# Altium PCB TuringSMD.PcbDoc (part 2 of 2)
Units mil, origin at the board's own origin, x right, y up, seen from the top; angles counter-clockwise.
Board outline 1102.36 x 3937.01 mil, 2 copper layers (Top Layer, Bottom Layer); 69 components, 85 nets, 266 pads, 122 vias.
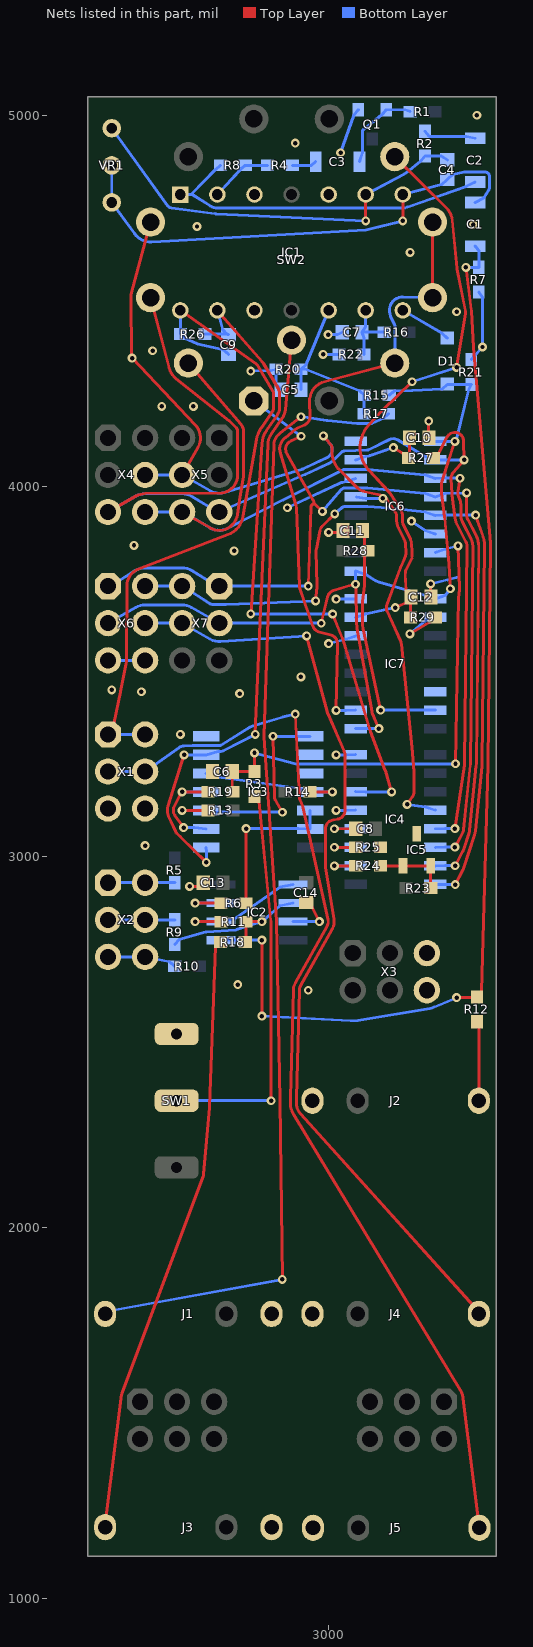
[diagram p2: the nets of this part, all layers, seen from the top]

## Via types
v1: diameter 24, hole 12, Top Layer to Bottom Layer, tented both sides, 122 vias

## Nets (pads, with @x,y where several pads share a name; then routed paths per layer and width w, separated by ;. In a path a pad name is that pad's centre, name@x,y a point inside that pad or via, vN(x,y) a via of type N, cw(c..) or ccw(c..) an arc to the next point about the centre after c; other vN are vias at no path point) (continued)
B4: IC4.12 IC6.5 SW2.4 X4.4 X5.4 | length 2651
  Top Layer w8: SW2.4@2519.71,4711.9 2468.21,4522.08 ccw(c2519.71,4508.1) 2466.35,4507.6 2467.82,4350.42 ccw(c2475.82,4350.49) v1(2470,4345) 2640.94,4163.94 cw(c2605,4130) 2647.97,4105.56 X5.4@2605,4030 ; v1(2985.69,4135.31) 3003.85,4114.03 cw(c2985.59,4098.45) 3009.59,4098.45 3009.59,4084.91 ccw(c3050.09,4084.91) 3013.8,4066.93 3018.71,4057.02 ccw(c3055,4075) 3026.36,4046.36 3077.06,3995.66 ccw(c3105.7,4024.3) 3097.22,3984.7 3139.9,3975.56 cw(c3138.22,3967.74) v1@3146.2,3968.3 ; v1@3146.22,3971.12 v1(3146.22,3966.84) ; v1(3211.66,3141.21) 3226.15,3161.86 ccw(c3206.5,3175.65) 3230.5,3175.92 3229.93,3226.1 ccw(c3189.93,3225.65) 3229.8,3228.84 3225.76,3280.04 ccw(c3169.93,3275.65) 3225.65,3281.22 3196.59,3573.14 ccw(c3164.75,3569.97) 3193.86,3583.26 3157.77,3662.31 cw(c3179.61,3672.28) 3157.1,3680.62 3193.16,3777.93 cw(c3231.14,3763.86) 3194.2,3780.48 3203.91,3802.05 ccw(c3174.73,3815.18) 3205.14,3805.24 3207.45,3812.29 ccw(c3177.03,3822.22) 3208.96,3824.24 3207.93,3840.59 ccw(c3168.01,3838.06) 3203.71,3856.1 3187.86,3887.49 cw(c3223.56,3905.52) 3183.56,3905.52 3183.56,3916.74 ccw(c3159.56,3916.74) 3179.59,3929.97 3157.01,3964.36 ccw(c3150.32,3959.97) 3155.96,3965.65 3155.01,3966.6 ccw(c3149.35,3960.95) v1@3146.2,3968.31 ; v1(3146.22,3966.84) 3146.17,3971.12 v1@3146.2,3968.31 ; v1(3146.22,3966.84) v1@3146.2,3968.3
  Bottom Layer w8: X4.4@2505,4030 X5.4@2605,4030 2680.56,3987.03 ccw(c2705,4030) 2719.17,3982.64 2927.11,4044.84 ccw(c2917.94,4075.5) 2931.55,4046.54 2995.8,4076.73 ccw(c2985.59,4098.45) 3003.85,4114.03 v1(2985.69,4135.31) ; IC6.5@3075.36,3970.65 3099.59,3966.84 v1(3146.22,3966.84) ; v1(3211.66,3141.21) 3261.13,3134.44 IC4.12@3287.65,3125.65
B5: IC4.13 IC6.10 R27.2 SW2.3 X4.5 X5.5 | length 3257.4
  Top Layer w8: X4.5@2405,3930 2480.56,3972.97 cw(c2505,3930) 2504.72,3979.43 2705.28,3980.57 ccw(c2705,4030) 2754.43,4030 2754.43,4147.72 ccw(c2740.43,4147.72) 2750.36,4157.59 2732.59,4175.36 ccw(c2722.72,4165.43) 2731.42,4176.4 2588.45,4289.8 cw(c2621.61,4331.61) 2570.02,4317.96 SW2.3@2519.71,4508.1 ; R27.2@3282.65,4075.65 3296.36,4087.39 3319,4131.59 cw(c3340.36,4120.65) 3364.36,4121.08 3365.35,4071.34 v1(3365.36,4070.65) 3365.33,4070.58 cw(c3358.19,4074.2) 3364.22,4068.94 3336.26,4036.93 ccw(c3354.33,4021.14) 3330.36,4019.97 3332.34,3979.59 ccw(c3372.29,3981.55) 3332.65,3976.24 3341,3913.95 ccw(c3396.5,3921.39) 3346.66,3895.84 3370.26,3849.8 cw(c3348.94,3838.79) 3372.94,3838.51 3366.23,3250.61 cw(c3342.23,3250.88) 3365.97,3247.33 v1(3340.37,3076.06)
  Bottom Layer w8: X4.5@2405,3930 2480.56,3972.97 cw(c2505,3930) 2505,3979.43 2605,3979.43 cw(c2605,3930) 2630.33,3972.45 2699.62,3931.1 ccw(c2703.67,3938) 2703.62,3930 X5.5@2705,3930 2706.3,3930.44 ccw(c2703.67,3938) 2706.88,3930.67 2937.2,4031.53 ccw(c2917.94,4075.5) 2938.36,4032.05 3002.6,4062.25 ccw(c2985.59,4098.45) 3013.97,4070.26 3034.76,4091.19 cw(c3042.57,4083.44) 3042.14,4094.43 3104.02,4096.86 ccw(c3103.59,4107.85) 3108.43,4097.97 3164.14,4125.3 cw(c3174.71,4103.75) 3187.15,4124.28 3261.13,4079.44 IC6.10@3287.65,4070.65 v1(3365.36,4070.65) ; IC4.13@3287.65,3075.65 3314.16,3076.06 v1(3340.37,3076.06)
B6: IC4.14 IC6.11 SW2.2 X4.6 X5.6 | length 2614.1
  Top Layer w8: X5.6@2605,3930 2680.56,3887.03 ccw(c2705,3930) 2753.93,3922.98 2759.32,3960.55 ; SW2.2@2621.61,4331.61 2763.16,4167.3 cw(c2740.43,4147.72) 2770.43,4147.72 2770.43,4030 cw(c2705,4030) 2769.45,4018.69 2759.48,3961.5 ccw(c2791,3956) 2759.33,3960.55 ; v1(3340.78,3025.86) 3361.54,3064.76 ccw(c3340.37,3076.06) 3364.24,3073.61 3382.02,3246.79 ccw(c3342.23,3250.88) 3382.23,3250.48 3388.94,3838.33 ccw(c3348.94,3838.79) 3384.54,3857.03 3360.9,3903.14 cw(c3396.5,3921.39) 3356.5,3921.39 3356.5,3950.15 ccw(c3324.5,3950.15) 3354.25,3961.93 3349.98,3972.71 cw(c3372.29,3981.55) 3348.6,3985.35 v1(3354.33,4021.14)
  Bottom Layer w8: X4.6@2505,3930 X5.6@2605,3930 2605.11,3930 cw(c2604.91,3922) 2608.95,3928.91 2680.04,3887.33 ccw(c2705,3930) 2727.45,3885.96 2878.06,3962.72 cw(c2888.96,3941.33) 2878.15,3962.76 3037.61,4043.26 cw(c3042.57,4033.44) 3042.57,4044.44 3103.59,4044.44 cw(c3103.59,4033.44) 3104.64,4044.39 3261.13,4029.44 IC6.11@3287.65,4020.65 3314.16,4021.14 v1(3354.33,4021.14) ; IC4.14@3287.65,3025.65 3314.16,3025.86 v1(3340.78,3025.86)
B7: IC4.15 IC6.12 SW2.1 X6.1 X7.1 | length 2703.3
  Top Layer w8: v1(2925.92,4134.26) 2897.9,4121.27 ccw(c2908,4099.5) 2887.13,4087.64 2958.95,3961.22 cw(c2952,3957.26) 2960,3957.27 2960,3953.95 ; v1(2945,3730) 2952.09,3942.98 cw(c2960.08,3942.72) 2954.41,3948.36 2960,3953.95 ; v1(2983.28,3931.72) 2962.45,3951.5 cw(c2968,3957.27) 2962.36,3951.59 2960,3953.95 ; v1(3341.2,2975.87) 3361.93,3014.52 ccw(c3340.78,3025.86) 3363.59,3018.4 3378.38,3063.63 ccw(c3340.37,3076.06) 3380.16,3071.97 3397.93,3245.14 ccw(c3342.23,3250.88) 3398.23,3250.24 3404.93,3838.14 ccw(c3348.94,3838.79) 3398.75,3864.38 3375.16,3910.4 cw(c3396.5,3921.39) 3372.5,3921.39 3372.5,3950.15 ccw(c3324.5,3950.15) 3372.5,3950.46 v1(3372.29,3981.55)
  Bottom Layer w8: X6.1@2405,3730 2436.43,3746.06 2479.24,3772.19 cw(c2505,3730) 2505,3779.43 2605,3779.43 cw(c2605,3730) 2630.76,3772.19 2673.57,3746.06 X7.1@2705,3730 v1(2945,3730) ; SW2.1@2798.1,4229.71 v1(2925.92,4134.26) ; v1(2983.28,3931.72) 3034.25,3990.64 cw(c3042.57,3983.44) 3042.57,3994.44 3103.59,3994.44 cw(c3103.59,3983.44) 3104.5,3994.4 3148.22,3990.76 cw(c3146.22,3966.84) 3148.62,3990.72 3261.13,3979.44 IC6.12@3287.65,3970.65 3314.16,3979.44 v1(3372.29,3981.55) ; IC4.15@3287.65,2975.65 3314.16,2975.87 v1(3341.2,2975.87)
B8: IC4.16 IC6.13 X6.2 X7.2 | length 2181.4
  Top Layer w8: v1(2965,3690) 2968.87,3727.54 ccw(c2945,3730) 2968.99,3730.67 2966.37,3824.98 cw(c2990.36,3825.65) 2966.81,3830.25 2976.44,3879.6 cw(c3000,3875) 2983.17,3892.11 v1(3016.6,3925) ; v1(3341.61,2925.04) 3362.45,2964.71 ccw(c3341.2,2975.87) 3364,2968.38 3378.78,3013.38 ccw(c3340.78,3025.86) 3378.8,3013.43 3393.58,3058.63 ccw(c3340.37,3076.06) 3396.07,3070.34 3413.84,3243.45 ccw(c3342.23,3250.88) 3414.22,3250.06 3420.93,3837.9 ccw(c3348.94,3838.79) 3416.96,3862.38 v1(3396.5,3921.39)
  Bottom Layer w8: X6.2@2505,3730 X7.2@2605,3730 2605.11,3730 cw(c2604.91,3722) 2609.28,3728.7 2679.64,3682.84 ccw(c2687.28,3694.57) 2687.28,3680.57 2722.72,3680.57 ccw(c2722.72,3694.57) 2723.26,3680.58 v1(2965,3690) ; v1(3016.6,3925) 3035.24,3941.65 cw(c3042.57,3933.44) 3042.57,3944.44 3103.59,3944.44 cw(c3103.59,3933.44) 3104.31,3944.42 3161.14,3940.68 cw(c3159.56,3916.74) 3162.25,3940.59 3261.13,3929.44 IC6.13@3287.65,3920.65 3314.16,3921.39 v1(3396.5,3921.39) ; IC4.16@3287.65,2925.65 3314.16,2925.04 v1(3341.61,2925.04)
BUFFCLK1: 
BUFFCLK2: 
CHANGE_B: R10.2 X2.5 X2.6 | length 185.7
  Bottom Layer w8: X2.5@2405,2730 X2.6@2505,2730 cw(c2505,2722) 2506.58,2729.84 2571.28,2716.75 R10.2@2585,2705
CHANGE_T: R5.2 X2.1 X2.2 | length 180
  Bottom Layer w8: X2.1@2405,2930 R5.2@2585,2930
CHANGE_W: R9.1 X2.3 X2.4 | length 180
  Bottom Layer w8: X2.3@2405,2830 R9.1@2585,2830
CLK: D1.2 IC6.1 IC6.9 IC7.1 IC7.9 R15.2 R21.2 X6.3 X7.3 | length 2382.6
  Top Layer w8: v1(2980,3630) 2996.64,3700.51 cw(c3020,3695) 3012.95,3717.94 3063.49,3733.61 cw(c3065.86,3725.96) 3063.63,3733.65 3064.15,3733.8 cw(c3066.4,3726.12) 3065.34,3734.05 v1(3072.5,3735.01) 3073.65,3729.5 cw(c3065.82,3727.86) 3073.82,3728 3075.62,3627.86 ccw(c3155.61,3629.3) 3076.85,3615.26 3116.73,3391.44 ccw(c3140.36,3395.65) 3118.24,3386.34 v1(3135.36,3345.65) ; v1(3328.51,3722.94) 3324.86,3787.78 ccw(c3275.44,3785) 3324.73,3789.58 3313.18,3913.79 ccw(c3223.56,3905.52) 3312.74,3917.68 3304.29,3979.58 cw(c3336,3983.9) 3304,3983.9 3304,4002.81 cw(c3336,4002.81) 3305.54,4012.63 v1(3340.36,4120.65)
  Bottom Layer w8: X6.3@2405,3630 2480.56,3672.97 cw(c2505,3630) 2505,3679.43 2605,3679.43 cw(c2605,3630) 2629.44,3672.97 X7.3@2705,3630 v1(2980,3630) ; v1(3072.5,3735.01) 3072.5,3761.85 IC6.1@3073.08,3770.65 3099.59,3761.85 3122.29,3747.24 ccw(c3149.08,3788.86) 3135.16,3741.36 3261.13,3704.44 IC7.9@3287.65,3695.65 3314.16,3704.44 v1(3328.51,3722.94) ; IC7.1@3073.08,3345.65 v1(3135.36,3345.65) ; R15.2@3163.46,4245 3177.18,4256.75 3225.54,4257.34 ccw(c3225.25,4281.34) 3226.44,4257.37 3305.3,4261.28 3320,4274.02 R21.2@3385,4274.02 3377.95,4260.3 3344.81,4126.72 cw(c3337.05,4128.65) 3342.71,4122.99 v1(3340.36,4120.65) IC6.9@3287.65,4120.65
G1: 
G2: 
G3: 
G4: 
G5: 
G6: 
G7: 
G8: 
GND: C5.1 C6.1 C7.1 C10.1 C11.1 C12.1 C13.1 C14.1 IC1.3 IC1.5 IC1.12 IC2.3 IC3.7 IC3.9 IC3.10 IC4.5 IC4.8 IC5.3 IC6.6 IC6.8 IC6.14 IC7.6 IC7.8 IC7.14 J1.1 J2.1 J3.1 J4.1 J5.1 Q1.1 R7.2 R20.1 R21.1 R22.1 R25.2 SW1.1 X1.5 X1.6 X3.5 X3.6 X6.5 X6.6 | length 1515.4
  Top Layer w8: v1(2625.22,2920) 2648.13,2920 C13.1@2661.85,2930 ; C14.1@2940,2876.85 2955.69,2863.13 v1(2975,2825) ; v1(3000,3875) 3024.71,3875 C11.1@3038.43,3880 ; v1(3270,4175) 3270,4146.33 C10.1@3270.8,4130.65 ; v1(3275,3735.85) 3275,3716.33 C12.1@3275.8,3700.65
  Bottom Layer w8: X6.5@2405,3530 X6.6@2505,3530 ; v1(2790,4310) 2844.35,4311.03 R20.1@2858.07,4315 2858.13,4303.25 2858.13,4275.69 C5.1@2871.85,4260 ; v1(2888.96,3941.33) 3031.12,4007.89 cw(c3042.57,3983.44) 3037.07,4009.88 3046.57,4011.85 IC6.6@3073.08,4020.65 ; IC2.3@2904,2825 v1(2975,2825) ; v1(2985,4355) R22.1@3028.07,4355 ; v1(2998.78,4408.42) 3023.13,4408.42 C7.1@3036.85,4415 ; v1(3000,3575) 3046.57,3586.85 IC7.6@3073.08,3595.65 ; v1(3020,3125) 3046.57,3125 IC4.5@3073.08,3125.65 ; v1(3020,3275) 3046.57,3275 IC4.8@3073.08,3275.65 ; v1(3020,3695) 3046.57,3695 IC7.8@3073.08,3695.65 ; v1(3032.13,4898.96) 3068.45,5001.28 Q1.1@3080.2,5015 ; v1(3223.56,3905.52) 3261.13,3879.44 IC6.14@3287.65,3870.65 ; v1(3275,3735.85) 3320.8,3747.17 ccw(c3318.16,3757.85) 3321.01,3747.23 3350,3755 ; R21.1@3385,4340.94 3396.75,4354.66 v1(3415,4375) 3415,4509.35 R7.2@3405,4523.07
  other v1: 2945,2640 2755,2655 2505,3030 2600,3330 2760,3440 2495,3445 2415,3450 2925,3485 2745,3825 2475,3840 2550,4215 2635,4215 2525,4365 3345,4470 3220,4630 2645,4700 3390,4705 2910,4925 3400,5000
NetC1_1: C1.1 C4.2 IC1.7 VR1.2 VR1.3 | length 1353.8
  Top Layer w8: v1(3200,4715) IC1.7@3200,4786.3
  Bottom Layer w8: VR1.2@2415,4865 VR1.3@2415,4765 2476.58,4680.47 ccw(c2519.71,4711.9) 2522.7,4658.61 3101.34,4691.04 ccw(c3100,4715) 3105.76,4691.7 v1(3200,4715) ; IC1.7@3200,4786.3 3304.31,4813.13 C4.2@3320,4826.85 3335.69,4840.57 3365.27,4846.53 cw(c3367.44,4835.75) 3367.44,4846.75 3422.56,4846.75 cw(c3422.56,4835.75) 3433.56,4835.75 3433.56,4804.25 cw(c3422.56,4804.25) 3431.93,4798.49 3418.56,4776.75 C1.1@3395,4765
NetC2_1: C2.1 IC1.1 R8.2 | length 928.5
  Bottom Layer w8: IC1.1@2600,4786.3 2618.24,4786.27 2629.64,4786.27 cw(c2629.6,4778.27) 2631.56,4786.03 ; 2629.56,4786.49 2631.68,4788.61 ccw(c2626.03,4794.27) 2631.76,4788.69 2694.35,4853.25 R8.2@2708.07,4865 ; 2631.64,4786.01 cw(c2629.6,4778.27) 2633.84,4785.06 2680.72,4755.61 ccw(c2700,4786.3) 2700,4750.06 3200,4750.06 ccw(c3200,4786.3) 3212.04,4752.11 3371.44,4808.25 C2.1@3395,4820
NetC2_2: C2.2 R2.2 | length 141.9
  Bottom Layer w8: R2.2@3260,4956.93 3271.75,4943.21 3371.44,4943.21 C2.2@3395,4938.11
NetC3_1: C3.1 Q1.2 R1.1 | length 235.9
  Bottom Layer w8: C3.1@3083.11,4875 3090.85,4898.56 3090.85,4953.98 cw(c3101.85,4953.98) 3094.97,4962.56 3143.25,5001.28 Q1.2@3155,5015 3206.28,5015 R1.1@3220,5010
NetC3_2: C3.2 R4.2 | length 66.8
  Bottom Layer w8: R4.2@2901.93,4865 2953.25,4865 C3.2@2965,4875
NetC4_1: C4.1 IC1.6 R2.1 VR1.1 | length 1121.5
  Top Layer w8: v1(3100,4715) IC1.6@3100,4786.3
  Bottom Layer w8: VR1.1@2415,4965 2566.42,4755.85 ccw(c2577.76,4764.06) 2575.9,4750.18 2693.08,4734.52 ccw(c2700,4786.3) 2697.52,4734.11 v1(3100,4715) ; IC1.6@3100,4786.3 3203.43,4841.26 ccw(c3178.39,4888.39) 3211.97,4846.91 3248.25,4876.28 R2.1@3260,4890 3304.31,4890 C4.1@3320,4880
NetC5_2: C5.2 IC1.10 R15.1 R17.1 R20.2 | length 466
  Bottom Layer w8: C5.2@2925,4260 R20.2@2925,4315 2938.72,4326.75 IC1.10@3000,4473.7 ; R20.2@2926.97,4315 2938.72,4315 3082.82,4256.75 R15.1@3096.54,4245 ; R17.1@3095,4195 R15.1@3095,4243.46
NetC7_2: C7.2 IC1.9 R16.1 R22.2 | length 182.4
  Bottom Layer w8: R22.2@3095,4355 3095,4399.31 C7.2@3090,4415 ; IC1.9@3100,4473.7 3100,4430.69 C7.2@3090,4415 ; R16.1@3150,4415 C7.2@3090,4415
NetC8_2: C8.2 IC4.4 | length 115.4
  Top Layer w8: v1(3015.36,3075.65) C8.2@3073.08,3075.65
  Bottom Layer w8: v1(3015.36,3075.65) IC4.4@3073.08,3075.65
NetC9_1: C9.1 IC1.13 IC4.6 R26.1 | length 1848.1
  Top Layer w8: IC1.13@2700,4473.7 2820.11,4336.33 cw(c2790,4310) 2824.45,4330.33 2863.29,4264.68 cw(c2837.47,4249.4) 2867.47,4249.4 2867.47,4210.03 cw(c2837.47,4210.03) 2862.24,4193.1 2832.2,4149.16 ccw(c2904.84,4099.5) 2828.5,4143.26 ccw(c2884,4111.39) 2820.14,4115.57 v1(2790,3655) ; v1(3010.53,3654.87) 3037.02,3590.15 cw(c3000,3575) 3038.32,3586.46 3112.37,3338.77 ccw(c3135.36,3345.65) 3112.94,3337.09 3152.42,3233.57 cw(c3130,3225) 3152.99,3231.88 v1(3170,3175)
  Bottom Layer w8: R26.1@2666.93,4410 C9.1@2726.18,4410 ; IC1.13@2700,4473.7 2714.31,4421.87 C9.1@2726.18,4410 ; C9.1@2730,4408.15 cw(c2731.48,4416.01) 2726.58,4409.69 C9.1@2726.18,4410 ; v1(2790,3655) v1(3010.53,3654.87) ; IC4.6@3073.08,3175.65 3099.59,3175 v1(3170,3175)
NetC10_2: C10.2 IC6.7 R27.1 | length 212
  Top Layer w8: v1(3174.71,4103.75) 3202,4087.39 R27.1@3215.72,4075.65 3217.65,4087.39 C10.2@3217.65,4130.65
  Bottom Layer w8: IC6.7@3073.08,4070.65 3099.59,4079.44 3109.09,4081.42 ccw(c3103.59,4107.85) 3112.37,4082.32 v1(3174.71,4103.75)
NetC11_2: C11.2 IC7.15 R28.1 | length 644.5
  Top Layer w8: C11.2@3091.57,3880 3096.98,3864.31 3096.98,3837.39 R28.1@3106.15,3825.65 3096.5,3813.9 3096.5,3735.01 cw(c3072.5,3735.01) 3096.38,3732.6 3091.93,3688.66 ccw(c3155.61,3682.22) 3091.61,3682.22 3091.61,3629.3 ccw(c3155.61,3629.3) 3093.04,3615.85 v1(3140.36,3395.65)
  Bottom Layer w8: v1(3140.36,3395.65) IC7.15@3287.65,3395.65
NetD1_1: D1.1 IC1.8 | length 141.8
  Bottom Layer w8: IC1.8@3200,4473.7 3305.3,4412.73 D1.1@3320,4399.02
NetD2_2: 
NetD3_2: 
NetD4_2: 
NetD5_2: 
NetD6_2: 
NetD7_2: 
NetD8_2: 
NetD9_2: 
NetD10_1: 
NetD11_1: 
NetIC1_2: IC1.2 R4.1 R8.1 | length 168.8
  Bottom Layer w8: IC1.2@2700,4786.3 2761.28,4853.25 R8.1@2775,4865 R4.1@2835,4865
NetIC2_1: IC2.1 IC2.6 R11.2 | length 362.3
  Top Layer w8: v1(2640,2825) R11.2@2710,2825
  Bottom Layer w8: v1(2640,2825) IC2.6@2710,2825 2745,2832 2869,2918 IC2.1@2904,2925
NetIC2_2: IC2.2 R9.2 R11.1 R18.2 | length 446.8
  Top Layer w8: R18.2@2775,2770 2776.93,2781.75 R11.1@2776.93,2825 v1(2820,2825)
  Bottom Layer w8: R9.2@2585,2763.07 2596.75,2776.79 2668.06,2796.6 cw(c2671,2786) 2670.17,2796.97 2749.83,2803.03 ccw(c2749,2814) 2752.33,2803.52 v1(2820,2825) 2869,2868 IC2.2@2904,2875
NetIC2_7: IC2.7 R6.1 | length 140
  Top Layer w8: v1(2640,2875) R6.1@2710,2875
  Bottom Layer w8: v1(2640,2875) IC2.7@2710,2875
NetIC3_1: IC3.1 IC3.6 SW2.A | length 1657.7
  Top Layer w8: v1(2610,3275) 2566.82,3136.94 ccw(c2605,3125) 2568.64,3108.33 2586.79,3068.73 ccw(c2608.61,3078.73) 2592.13,3061.28 2601.48,3052.45 cw(c2585,3035) 2601.84,3052.1 v1(2670,2985) ; v1(2802,3330) 2836.05,4113.48 cw(c2884,4111.39) 2842.38,4135.3 cw(c2904.84,4099.5) 2845.44,4140.18 2875.43,4184.04 ccw(c2837.47,4210.03) 2883.29,4205.95 SW2.A@2900,4393.46
  Bottom Layer w8: v1(2610,3275) IC3.6@2669.76,3275 2701.69,3284.2 2705.88,3284.22 ccw(c2705.69,3311.22) 2717.95,3287.16 v1(2802,3330) ; IC3.1@2669.76,3025 2670,3015.22 v1(2670,2985)
NetIC3_2: IC3.2 IC3.4 R19.2 | length 306.8
  Top Layer w8: v1(2608.61,3078.73) 2585.48,3111.03 cw(c2605,3125) 2583.58,3135.83 2601.17,3170.61 cw(c2608.31,3167) 2602.64,3172.64 v1(2605,3175) R19.2@2675,3175
  Bottom Layer w8: v1(2605,3175) IC3.4@2669.76,3175 ; v1(2608.61,3078.73) 2637.84,3078.73 IC3.2@2669.76,3075
NetIC3_3: IC3.3 IC3.8 R13.1 | length 651.1
  Top Layer w8: v1(2605,3125) R13.1@2675,3125 ; v1(2850,3325) 2854.36,3158.96 ccw(c2865.35,3159.25) 2855.83,3153.76 ; 2855.82,3153.76 v1(2875.18,3120.18)
  Bottom Layer w8: v1(2605,3125) IC3.3@2669.76,3125 2701.69,3120.18 v1(2875.18,3120.18) ; v1(2850,3325) IC3.8@2950.24,3325
NetIC3_5: IC3.5 IC3.11 R14.1 | length 405.3
  Top Layer w8: R14.1@2950,3175 v1(3010,3175)
  Bottom Layer w8: IC3.5@2669.76,3225 2701.69,3215.22 2918.31,3184.78 IC3.11@2950.24,3175 v1(3010,3175)
NetIC3_12: IC3.12 IC3.13 R6.2 | length 424
  Top Layer w8: R6.2@2776.93,2875 2777.39,2886.75 v1(2777.39,3076.16)
  Bottom Layer w8: v1(2777.39,3076.16) 2918.31,3076.16 IC3.13@2950.24,3075 IC3.12@2950.24,3125
NetIC4_2: IC4.2 R24.1 | length 115.4
  Top Layer w8: v1(3015.36,2975.65) R24.1@3073.08,2975.65
  Bottom Layer w8: v1(3015.36,2975.65) IC4.2@3073.08,2975.65
NetIC4_3: IC4.3 R25.1 | length 115.4
  Top Layer w8: v1(3015.36,3025.65) R25.1@3073.08,3025.65
  Bottom Layer w8: v1(3015.36,3025.65) IC4.3@3073.08,3025.65
NetIC5_1: IC5.1 IC5.2 R23.1 R24.2 | length 195.2
  Top Layer w8: R24.2@3140.01,2975.65 IC5.2@3275.17,2975.65 3275.17,2927.39 R23.1@3275.36,2915.65
NetIC7_10: IC7.10 R29.2 | length 164.4
  Top Layer w8: v1(3219.31,3601.42) 3273.93,3633.9 R29.2@3287.65,3645.65
  Bottom Layer w8: v1(3219.31,3601.42) 3261.13,3636.85 IC7.10@3287.65,3645.65
NetJ1_3: J1.3 R17.2 | length 3098.3
  Top Layer w8: v1(2875,1860) 2869,2342.35 ccw(c2845,2342.05) 2869,2342.49 2859.99,2825.74 ccw(c2820,2825) 2859.9,2827.83 2826.06,3323.36 cw(c2850,3325) 2826.01,3325.79 2852.02,4112.45 cw(c2884,4111.39) 2856.23,4127.29 cw(c2904.84,4099.5) 2870.18,4143.48 v1(2925.4,4186.99)
  Bottom Layer w8: J1.3@2397.24,1766.89 2397.24,1772.8 v1(2875,1860) ; v1(2925.4,4186.99) 2994.15,4176.91 ccw(c3001.9,4229.71) 2996.36,4176.63 3076.14,4168.31 ccw(c3077.28,4179.25) 3077.28,4168.25 3112.72,4168.25 ccw(c3112.72,4179.25) 3117.25,4169.23 3148.21,4183.25 R17.2@3161.93,4195
NetJ2_3: J2.3 R12.1 | length 213.9
  Top Layer w8: R12.1@3400,2555 3405.12,2541.28 J2.3@3405.12,2342.05
NetJ3_3: J3.3 R18.1 | length 1628.3
  Top Layer w8: J3.3@2397.24,1191.73 2397.24,1197.64 2441.82,1549.48 cw(c2455.71,1547.72) 2442.6,1552.62 2661.22,2136.88 ccw(c2634.06,2147.05) 2662.94,2144.47 2678.88,2323.05 ccw(c2634.06,2327.05) 2679.03,2325.45 2694.35,2758.25 R18.1@2708.07,2770
NetR3_2: R3.2 SW1.2 | length 1082
  Top Layer w8: R3.2@2800,3163.07 2811.75,3149.35 2843.88,2827.38 cw(c2820,2825) 2844,2825.05 v1(2845,2342.05)
  Bottom Layer w8: SW1.2@2590,2342.05 v1(2845,2342.05)
NOISE: C1.2 IC2.5 R7.1 R12.2 | length 2975.3
  Top Layer w8: v1(2820,2570) v1(2820,2775) ; v1(3345,2620) 3388.25,2620 R12.2@3400,2621.93 3411.75,2635.65 3430.19,3248.23 ccw(c3342.23,3250.88) 3430.22,3249.87 3436.93,3837.67 ccw(c3348.94,3838.79) 3436.61,3846.37 3391.09,4372.93 cw(c3415,4375) 3391.05,4373.52 3384.92,4472.47 ccw(c3345,4470) 3384.68,4475.07 v1(3370,4590)
  Bottom Layer w8: IC2.5@2710,2775 v1(2820,2775) ; v1(2820,2570) 3060.79,2557.67 ccw(c3065,2640) 3078.6,2558.7 3273.16,2591.24 ccw(c3265,2640) 3284.15,2594.43 v1(3345,2620) ; v1(3370,4590) R7.1@3405,4590 3405,4635.14 C1.2@3395,4646.89
P1: 
P2: 
P3: 
P4: 
P5: 
P6: 
P7: 
P8: 
PULSE_OUT: J4.3 X6.4 X7.4 | length 2538.8
  Top Layer w8: v1(2940.73,3595.73) 2996.85,3388.68 ccw(c3020,3395) 2998,3385.4 3042,3284.6 cw(c3020,3275) 3044,3275 3044,3125 cw(c3020,3125) 3023.79,3101.3 3011.57,3099.34 ccw(c3015.36,3075.65) 2991.36,3075.65 2991.36,2975.65 ccw(c3015.36,2975.65) 2991.67,2971.8 3014.48,2831.41 cw(c2975,2825) 3009.89,2805.43 2924.06,2651.73 ccw(c2945,2640) 2921.01,2640.68 2912.79,2349.18 ccw(c2956.3,2347.95) 2912.77,2347.95 2912.77,2336.14 ccw(c2956.3,2336.14) 2923.96,2307.01 3405.12,1772.8 J4.3@3405.12,1766.89
  Bottom Layer w8: X6.4@2505,3630 X7.4@2605,3630 2680.56,3587.03 ccw(c2705,3630) 2708.19,3580.67 v1(2940.73,3595.73)
SCALE_B: 
SCALE_T: C9.2 IC1.14 R26.2 X1.1 X1.2 | length 1790.7
  Top Layer w8: X1.1@2405,3330 2421.06,3361.43 2438.5,3445.1 ccw(c2415,3450) 2438.54,3445.31 2453.48,3520.34 ccw(c2405,3530) 2454.43,3529.72 2455.57,3730.28 cw(c2505,3730) 2487.25,3776.14 2728.49,3868.93 ccw(c2705,3930) 2769.47,3918.84 2805.17,4125.04 cw(c2884,4111.39) 2814.65,4151.28 cw(c2904.84,4099.5) 2818.99,4158.19 2849,4202.08 ccw(c2837.47,4210.03) 2851.47,4210.03 2851.47,4249.4 ccw(c2837.47,4249.4) 2849.52,4256.53 2810.66,4322.22 ccw(c2790,4310) 2803.85,4329.6 IC1.14@2600,4473.7
  Bottom Layer w8: X1.1@2405,3330 X1.2@2505,3330 ; IC1.14@2600,4473.7 R26.2@2600,4410 2613.72,4398.25 2644.67,4384.23 ccw(c2649.21,4394.25) 2646.86,4383.51 2714.31,4368.72 C9.2@2730,4355
SCALE_W: J5.3 X1.3 X1.4 | length 2903.4
  Top Layer w8: v1(2910,3385) 2921.3,3158.7 ccw(c2932.28,3159.25) 2922.23,3154.79 2927.33,3143.21 cw(c2875.18,3120.18) 2930.81,3132.62 2998.42,2830.24 cw(c2975,2825) 2995.94,2813.28 2910.08,2659.5 ccw(c2945,2640) 2905.02,2641.13 2896.8,2349.63 ccw(c2956.3,2347.95) 2896.77,2347.95 2896.77,2336.14 ccw(c2956.3,2336.14) 2905.34,2305.37 3358.64,1554.96 cw(c3346.65,1547.72) 3360.54,1549.48 3405.12,1197.64 J5.3@3405.12,1191.73
  Bottom Layer w8: X1.3@2405,3230 X1.4@2505,3230 2596.12,3294.58 cw(c2610,3275) 2609.22,3298.99 2633.48,3299.77 cw(c2633.84,3288.78) 2633.77,3299.78 2705.76,3300.22 ccw(c2705.69,3311.22) 2711.51,3301.88 2789.31,3350.37 cw(c2802,3330) 2795.31,3353.05 2875.54,3376.32 cw(c2882.22,3353.27) 2876.37,3376.55 v1(2910,3385)
STEP12: C12.2 IC7.7 R29.1 SW2.8 | length 1661.3
  Top Layer w8: SW2.8@3178.39,4888.39 3317.9,4749.76 cw(c3280.29,4711.9) 3333.4,4717.11 3346.11,4587.65 ccw(c3370,4590) 3346.46,4585.3 3368.54,4474.7 cw(c3345,4470) 3368.69,4466.16 v1(3345,4320) ; v1(3179.61,3672.28) 3208.93,3684.96 3222.65,3698.68 3208.93,3716.33 3206.67,3762.67 cw(c3231.14,3763.86) 3209.28,3774.92 3224.2,3804.42 ccw(c3217.06,3808.03) 3224.28,3804.57 ; R29.1@3220.72,3645.65 C12.2@3220.72,3700.65 ; 3224.9,3809.61 3225.02,3821.75 ccw(c3177.03,3822.22) 3224.93,3825.25 3223.9,3841.57 ccw(c3168.01,3838.06) 3217.99,3863.31 3202.16,3894.66 cw(c3223.56,3905.52) 3199.56,3905.52 3199.56,3916.74 ccw(c3159.56,3916.74) 3193.16,3938.45 3166.38,3979.87 ccw(c3146.22,3966.84) 3163.72,3983.27 3108.73,4042.54 cw(c3174.71,4103.75) 3108.5,4164.71 3143.29,4202.5 cw(c3199.93,4150.33) 3146.62,4205.89 v1(3225.25,4281.34)
  Bottom Layer w8: IC7.7@3073.08,3645.65 3099.59,3654.44 v1(3179.61,3672.28) ; v1(3225.25,4281.34) v1(3345,4320)
STEP16: IC7.2 SW2.9 SW2.10 SW2.11 | length 1733.5
  Top Layer w8: v1(3020,3395) 3023.99,3574.47 ccw(c3000,3575) 3006.18,3598.19 2973.82,3606.81 cw(c2980,3630) 2957.35,3622.07 2922.35,3722.07 cw(c2945,3730) 2921.02,3729.09 2912.94,3942.24 ccw(c2888.96,3941.33) 2911.93,3948.28 2869.71,4087.92 cw(c2908,4099.5) 2883.06,4130.77 2910.96,4153.02 cw(c2925.92,4134.26) 2915.77,4156.01 2935.55,4165.25 ccw(c2925.4,4186.99) 2949.39,4187.49 2948.54,4228.6 cw(c3001.9,4229.71) 2988.25,4281.31 SW2.11@3178.39,4331.61 ; SW2.10@3280.29,4508.1 SW2.9@3280.29,4711.9
  Bottom Layer w8: v1(3020,3395) 3046.57,3395 IC7.2@3073.08,3395.65 ; SW2.11@3178.39,4331.61 3178.72,4399.2 ccw(c3167.72,4399.25) 3178.72,4399.25 3178.72,4430.75 ccw(c3167.72,4430.75) 3177.72,4435.33 3167.05,4458.6 cw(c3200,4473.7) 3200.84,4509.94 SW2.10@3280.29,4508.1
WRITE_SW: C6.2 IC6.15 R3.1 R19.1 | length 1363.3
  Top Layer w8: R19.1@2741.93,3175 2740,3186.75 C6.2@2740,3230 R3.1@2800,3230 v1(2800,3280) ; v1(3342.23,3250.88) 3349.35,3629.07 ; v1(3348.94,3838.79) 3352.5,3723.68 cw(c3328.51,3722.94) 3352.44,3721.14 3350.66,3697.42 ccw(c3382.57,3695.02) 3350.58,3695.61 3349.35,3629.09
  Bottom Layer w8: v1(2800,3280) 2911.51,3250.58 ccw(c2914.31,3261.22) 2914.31,3250.22 2986.16,3250.22 ; 2986.18,3250.22 v1(3342.23,3250.88) ; IC6.15@3287.65,3820.65 3314.16,3829.44 v1(3348.94,3838.79)
pads on no net: IC7.3 IC7.4 IC7.5 IC7.11 IC7.12 IC7.13 J1.2 J2.2 J3.2 J4.2 J5.2 Q1.3 SW2.12 X7.5 X7.6 X8.1 X8.2 X8.3 X8.4 X8.5 X8.6 X9.1 X9.2 X9.3 X9.4 X9.5 X9.6
copper on no net: | length 7.1
  Bottom Layer w8: 2635,4215 2640,4220

## Polygon pours and split planes (outlines as drawn)
GND on Top Layer "NONET_L02_P-001" (solid, remove dead copper, pour order 0): 2350,5050 2350,1115 3455,1115 3450,1120 3450,5050
GND on Bottom Layer "NONET_L02_P-001" (solid, remove dead copper, pour order 1): 2350,5050 2350,1115 3455,1115 3450,1120 3450,5050

## Silkscreen, mask and mechanical layers (free items; w line width, h text height)
Board Shape:
  the board outline again, w1